# Altium PCB ledcube_v2.PcbDoc (part 18 of 18)
Units mil, origin at the board's own origin, x right, y up, seen from the top; angles counter-clockwise.
Board outline 3130 x 3300 mil, 2 copper layers (Top Layer, Bottom Layer); 188 components, 216 nets, 29515 pads, 250 vias.
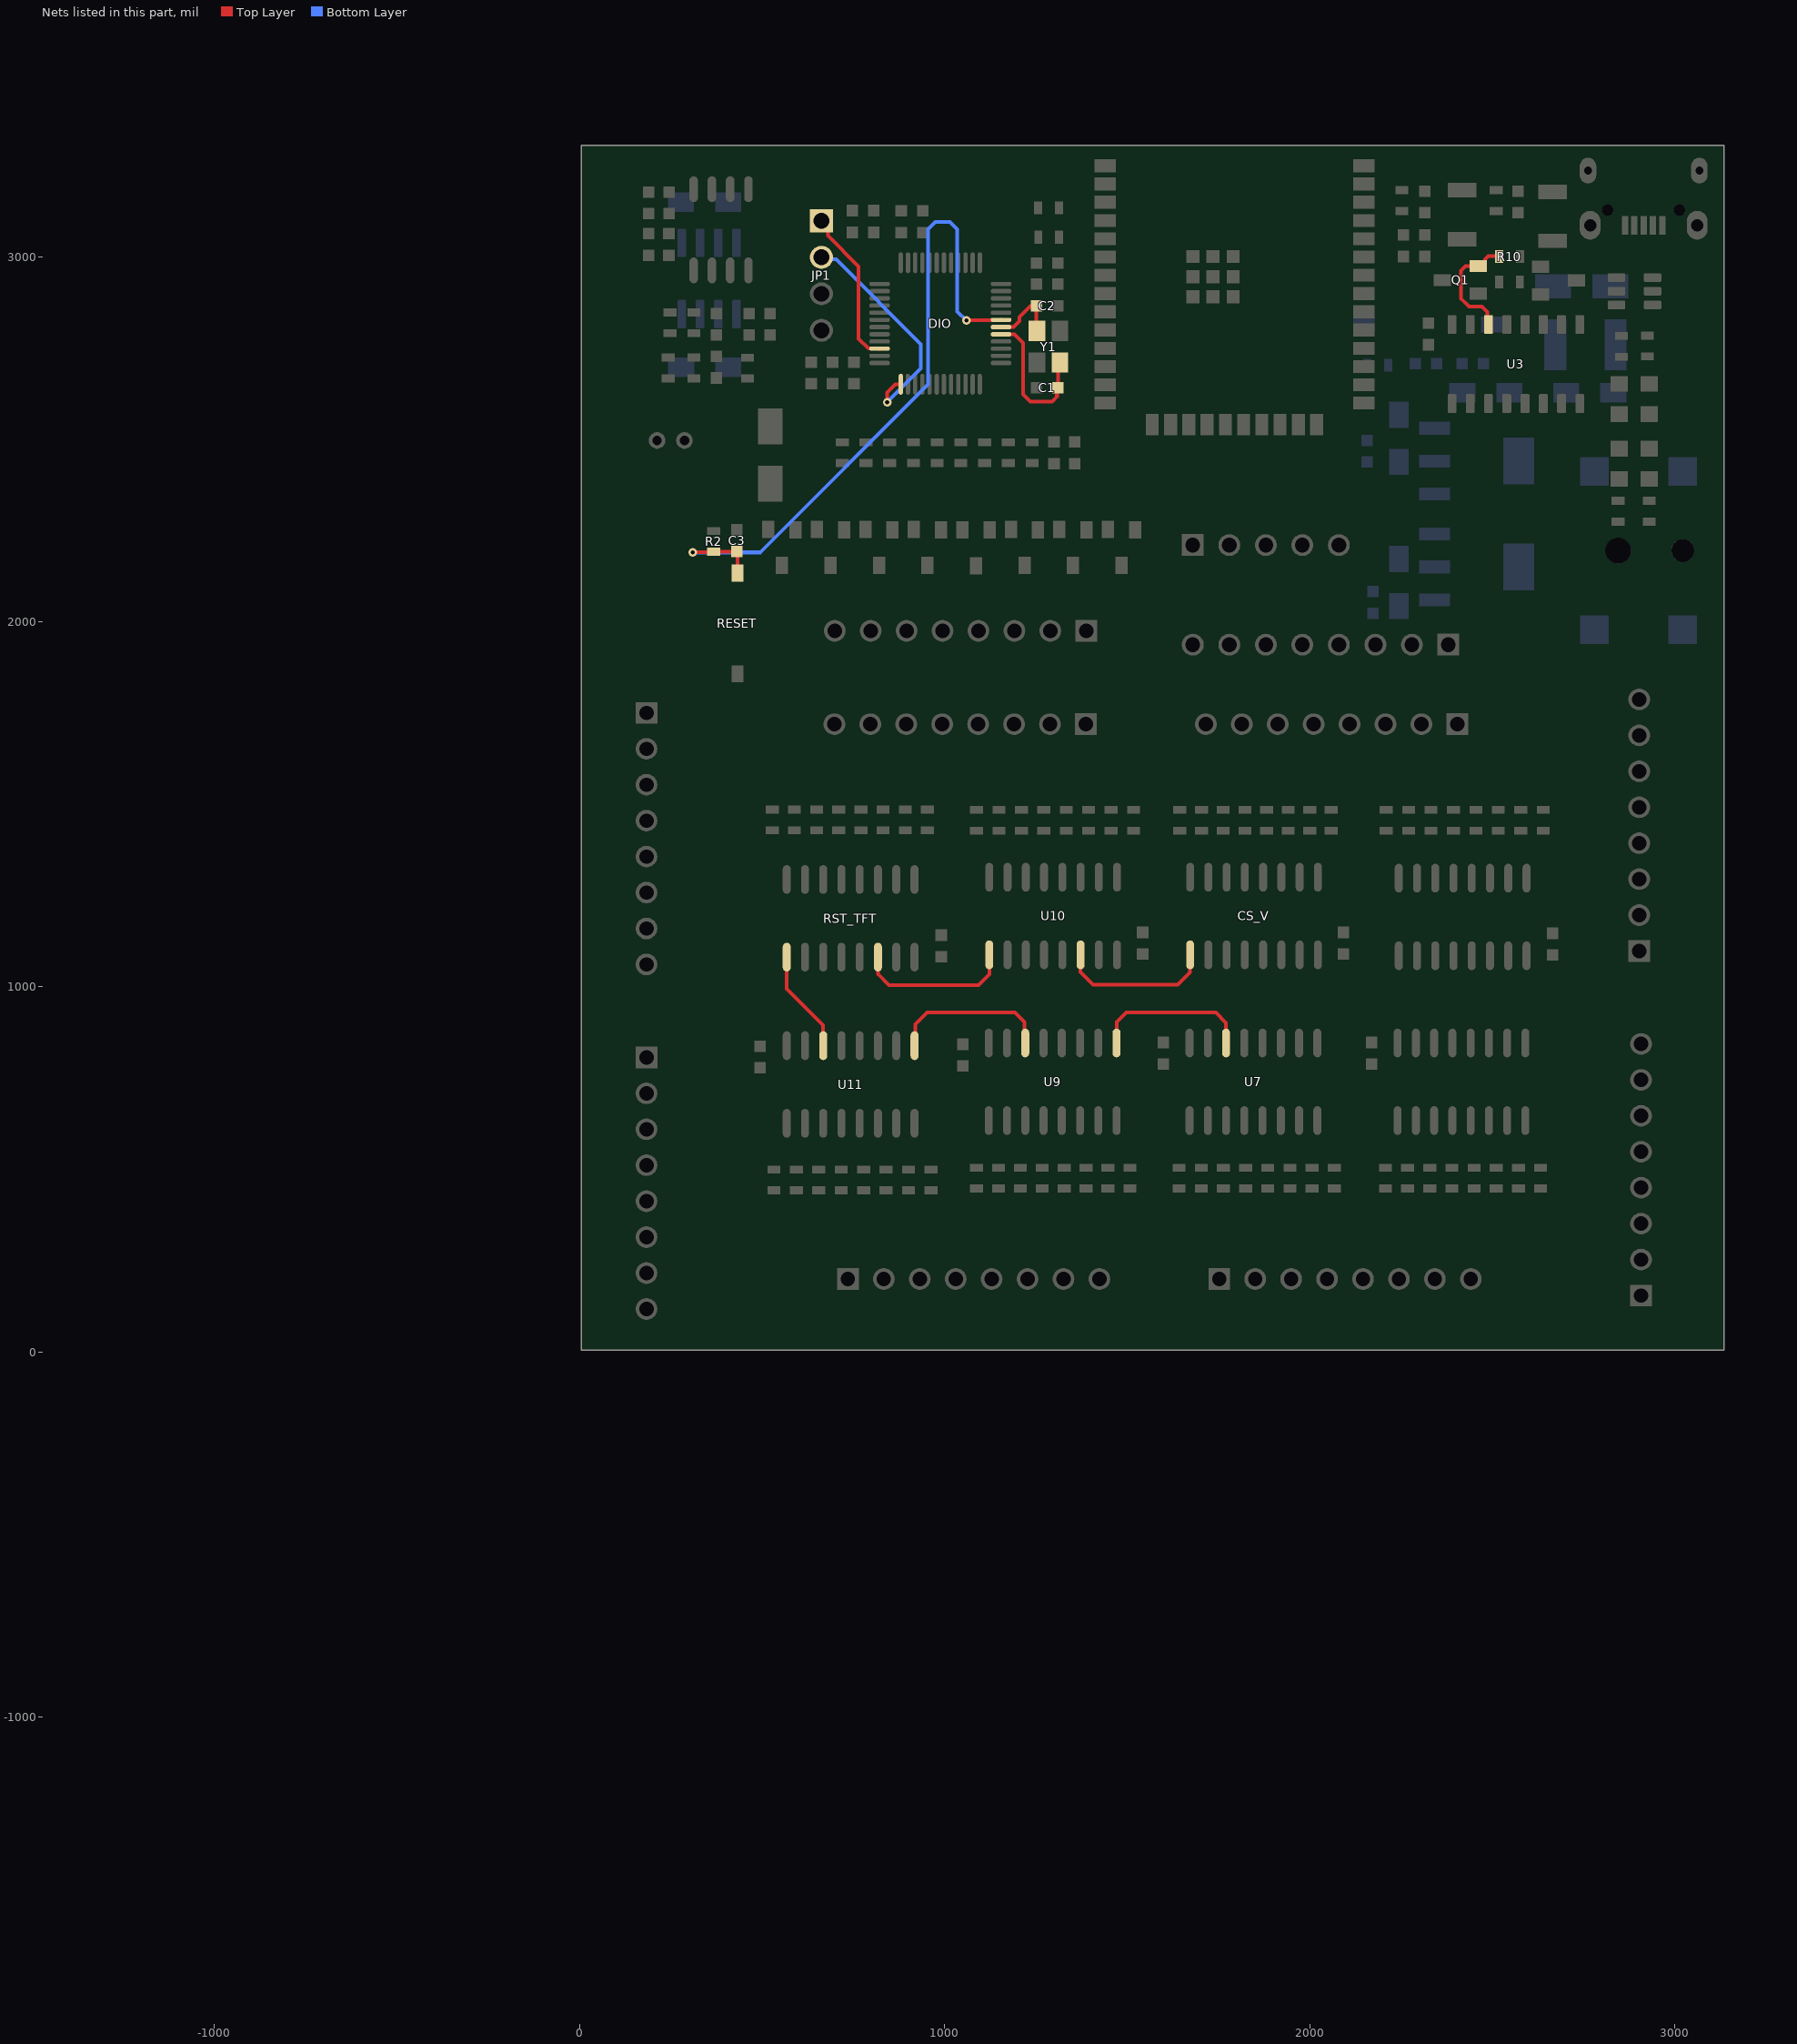
[diagram p17: the nets of this part, all layers, seen from the top]

## Via types
v1: diameter 23.62, hole 11.81, Top Layer to Bottom Layer, tented both sides, 128 vias
v2: diameter 23.62, hole 11.81, Top Layer to Bottom Layer, 122 vias

## Nets (pads, with @x,y where several pads share a name; then routed paths per layer and width w, separated by ;. In a path a pad name is that pad's centre, name@x,y a point inside that pad or via, vN(x,y) a via of type N, cw(c..) or ccw(c..) an arc to the next point about the centre after c; other vN are vias at no path point) (continued)
NetU7_14: U7.14 U9.9 | length 434.8
  Top Layer w10: U9.9@1471.06,846.61 1471.06,903.58 1497.48,930 1742.95,930 1771.06,901.88 U7.14@1771.06,846.61
NetU8_9: CS_V.9 U10.14 | length 424.1
  Top Layer w10: U10.14@1372.56,1087.91 1372.56,1040.39 1407.4,1005.55 1638.03,1005.55 1672.56,1040.07 CS_V.9@1672.56,1087.91
NetU9_14: U9.14 U11.9 | length 440.9
  Top Layer w10: U11.9@917.56,839.21 919.66,841.31 919.66,897.18 952.72,930.23 1192.72,930.23 1218.83,904.11 1218.83,848.84 U9.14@1221.06,846.61
NetU10_9: RST_TFT.14 U10.9 | length 428.9
  Top Layer w10: RST_TFT.14@817.56,1081.61 817.56,1035.39 847.72,1005.23 1092.72,1005.23 1122.56,1035.07 U10.9@1122.56,1087.91
NetU11_14: RST_TFT.9 U11.14 | length 283.8
  Top Layer w10: RST_TFT.9@567.56,1081.61 567.56,995.39 667.56,895.39 U11.14@667.56,839.21
OSC_IN: C1.2 DIO.5 Y1.1 | length 414
  Top Layer w10: DIO.5@1154.66,2787.34 1155.01,2786.99 1190.96,2786.99 1214.72,2763.23 1214.72,2623.23 1234.74,2603.2 1294.74,2603.2 1307.85,2616.31 1307.85,2638.57 C1.2@1310.48,2641.2 1310.48,2704.14 Y1.1@1316.24,2709.9
OSC_OUT: C2.2 DIO.6 Y1.3 | length 197.1
  Top Layer w10: DIO.6@1154.66,2807.02 1188.56,2807.02 1204.74,2823.2 1204.74,2834.74 1234.7,2864.7 1251,2864.7 C2.2@1251.5,2865.2 1251.5,2798.25 Y1.3@1253.25,2796.51
RESET: C3.2 DIO.7 R2.1 RESET.2 | length 1895.2
  Top Layer w10: v1(310,2190) 310.84,2190.84 366.87,2190.84 R2.1@367.72,2191.69 429.7,2191.69 C3.2@430.72,2192.7 432.72,2190.7 RESET.2@432.72,2133.03 ; v1(1060,2825) 1061.36,2826.36 1154.32,2826.36 DIO.7@1154.66,2826.71
  Bottom Layer w10: v1(310,2190) 495,2190 955,2650 955,3075 975,3095 1015,3095 1035,3075 1035,2850 v1(1060,2825)
RTS: Q1.2 R10.1 U3.14 | length 324.2
  Top Layer w10: U3.14@2490,2814.21 2486.68,2817.53 2486.68,2848.32 2471.94,2863.06 2436.94,2863.06 2415,2885 2415,2961.74 2427.29,2974.03 2468.82,2974.03 2480.55,2985.76 2480.55,2992.65 2489.16,3001.26 2517.91,3001.26 R10.1@2519.17,3000
SWCLK: DIO.37 JP1.2 | length 641.5
  Top Layer w10: v1(842.72,2601.11) 842.72,2627.72 865.01,2650.01 879.54,2650.01 DIO.37@880.06,2650.53
  Bottom Layer w10: JP1.2@662.68,2998.2 668.5,2992.38 702.62,2992.38 935,2760 935,2693.39 v1(842.72,2601.11)
SWDIO: DIO.34 JP1.1 | length 433.8
  Top Layer w10: JP1.1@662.68,3098.2 680.38,3080.5 680.38,3057.57 764.74,2973.2 764.74,2775.26 791.69,2748.31 821.64,2748.31 DIO.34@821.99,2747.97
pads on no net: DIO.1 DIO.3 DIO.4 DIO.11 DIO.16 DIO.18 DIO.19 DIO.20 DIO.21 DIO.22 DIO.25 DIO.26 DIO.27 DIO.28 DIO.29 DIO.30 DIO.31 DIO.32 DIO.33 GND.4@1439.84,3098.82 GND.5@1439.84,3048.82 GND.6@1439.84,2998.82 GND.7@1439.84,2948.82 GND.8@1439.84,2898.82 GND.17 GND.18 GND.19 GND.20 GND.21 GND.22 GND.23 GND.26 GND.31 GND.32 GND.33 GND.36 GND.39 IC1.5 IC1.6 IC1.7 J13.MH1 J13.MH2 MISO_H.4 MISO_H.MH1 MISO_H.MH2 U3.7 U3.8 U3.9 U3.10 U3.11 U3.12 U3.15 U5.9 U13.1 U13.7
copper on no net:
  other v2: 1707.56,2889.76 1762.68,2889.76 1680,2917.32 1735.12,2917.32 1790.24,2917.32 1707.56,2944.88 1762.68,2944.88 1680,2972.44 1735.12,2972.44 1790.24,2972.44 1707.56,3000 1762.68,3000

## Polygon pours and split planes (outlines as drawn)
GND on Bottom Layer "GND_L02_P001" (solid, remove dead copper, pour order 1): 0,3310 3140,3310 3140,0 0,0
GND on Top Layer "GND_L01_P000" (solid, remove dead copper, pour order 0): 0,3310 3140,3310 3140,0 0,0

## Keep-outs
Keep-Out Layer:
  the board outline again, w10

## Other copper
Top Layer:
  drawing of 1649 lines, arcs and shapes, not listed
Bottom Layer:
  region net 5V: 195,3025.71 195,3205 255,3265 490,3265 510,3245 510,3095 500,3085 420,3085 400,3065 400,2945 495,2850 495,2590 225,2320 225,2130 575,1780 1460,1780 1460,1800 1445,1815 605,1815 265,2155 265,2310 525,2570 525,2875 445,2955 445,3005 470,3030 490,3030 530,3070 530,3260 505,3285 235,3285 170,3220 170,3035 147,3012
  pour cut-out: 545,3293.44 545,2466.56 125,2466.56 125,3293.44
  pour cut-out: 1210,2895 1360,2895 1360,2605 1210,2605
  pour cut-out: 1190,2615 1190,3015 785,3015 785,2615
  region net 5V: 1435,1780 1440,1775 1440,1440 1530,1350 1530,1060 1520,1050 1520,1025 1530,1015 1555,1015 1565,1025 1565,1050 1555,1060 1555,1355 1465,1445 1465,1780
  region net 5V: 135,3025 175,3025 185,3035 200,3035 200,2955 180,2955 180,2975 170,2985 135,2985 125,2995 125,3015 125,3000 125,3015
  region net 5V: 180,2655 200,2655 210,2665 210,2690 200,2700 200,2955 180,2955 180,2700 170,2690 170,2665
  region net NetC37_2: 360,2875 370,2885 395,2885 405,2875 405,2765 420,2750 450,2720 450,2675 440,2665 375,2665 360,2680
  region net NetC37_1: 265,2855 265,2880 275,2890 290,2890 300,2880 300,2745 320,2725 320,2675 310,2665 245,2665 240,2670 240,2720 265,2745
  region net -5V: 240,3175 310,3245 470,3245 475,3240 475,3230 470,3225 320,3225 300,3205 300,3190 315,3175 315,3120 295,3100 295,3000 285,2990 270,2990 260,3000 260,3100 240,3120
  region net NetC43_2: 2105,2825 2125,2845 2170,2845 2225,2790 2225,2735 2235,2725 2305,2725 2315,2715 2315,2695 2310,2690 2230,2690 2220,2680 2195,2680 2185,2690 2185,2715 2195,2725 2195,2775 2180,2790 2120,2790 2105,2805
  region net 5V_USB: 2985,2915 2995,2905 3015,2905 3025,2915 3025,2940 3015,2950 3000,2950 2955,2995 2590,2995 2485,2890 2485,2855 2460,2830 2405,2830 2325,2750 2325,2695 2335,2685 2365,2685 2380,2700 2380,2755 2430,2805 2455,2805 2470,2790 2525,2790 2535,2800 2535,2830 2520,2845 2520,2890 2600,2970 2960,2970 2985,2945 2985,2935
  region net 3V3: 2522.5,2230 2605,2230 2645,2190 2645,2120 2610,2085 2610,2020 2485,1895 2390,1895 2355,1895 2335,1915 2335,1960 2350,1975 2480,1975 2525,2020 2525,2080 2475,2130 2240,2130 2205,2095 2205,2070 2195,2060 2155,2060 2145,2070 2145,2145 2210,2210 2492.5,2210
  region net 5V: 2505,2485 2540,2520 2610,2520 2640,2490 2640,2390 2605,2355 2545,2355 2515,2385 2485,2415 2295,2415 2275,2395 2210,2395 2195,2395 2175,2380 2175,2360 2270,2265 2455,2265 2465,2255 2465,2235 2455,2225 2245,2225 2120,2350 2120,2429.94 2120,2440 2145,2465 2200,2465 2220,2485 2275,2485 2295,2465 2490,2465
  region net 9V: 2600,2935 2625,2960 2710,2960 2735,2935 2735,2715 2700,2680 2640,2680 2625,2695 2625,2715 2595,2745 2465,2745 2440,2720 2440,2675 2460,2655 2460,2600 2450,2590 2390,2590 2370,2570 2370,2565 2390,2545 2390,2515 2375,2500 2305,2500 2290,2515 2290,2550 2320,2580 2320,2605 2360,2645 2365,2650 2370,2655 2390,2675 2390,2740 2425,2775 2580,2775 2600,2795
  region net NetC36_2: 2780,2815 2810,2845 2860,2845 2890,2815 2890,2605 2865,2580 2865,2540 2865,2510 2900,2475 3075,2475 3100,2450 3100,2380 3075,2355 2740,2355 2710,2385 2710,2455 2765,2510 2765,2800

## Silkscreen, mask and mechanical layers (free items; w line width, h text height)
Top Overlay:
  drawing of 31 lines, arcs and shapes, not listed
Bottom Overlay:
  drawing of 58 lines, arcs and shapes, not listed
  text "LEDCUBE 8x8x8 - ver 1" at 1325,1160.62 h59.06
Mechanical 2:
  drawing of 11198 lines, arcs and shapes, not listed
Top Tenting:
  drawing of 33371 lines, arcs and shapes, not listed
Top 3D Body:
  lines w0: -1372.3,-1735.55 ccw(c-1372.3,-1735.55) -1372.3,-1735.55 ; -1372.3,-1735.55 ccw(c-1372.3,-1735.55) -1372.3,-1735.55 ; -1372.29,-1735.57 -1372.39,-1735.57 -1372.39,-1735.44 -1372.29,-1735.44 -1372.29,-1735.57
  text "Y1" at -1372.32,-1735.55 h0.04 r90
Bottom 3D Body:
  drawing of 1630 lines, arcs and shapes, not listed
Bottom Tenting:
  drawing of 869 lines, arcs and shapes, not listed
Top Component Outline:
  lines w0: -1370.86,-1734.95 -1370.56,-1734.95
  text "PCB Edge" at -1370.66,-1734.93 h0.02 r180
Top Courtyard:
  lines w0: -1370.87,-1736.24 -1370.87,-1736.31 -1370.82,-1736.31 -1370.82,-1736.24 ; -1370.87,-1735.89 -1370.87,-1735.82 -1370.82,-1735.82 -1370.82,-1735.89 ; -1370.57,-1736.24 -1370.57,-1736.31 -1370.63,-1736.31 ; -1370.57,-1735.89 -1370.57,-1735.82 -1370.63,-1735.82 ; -1370.63,-1736.31 ccw(c-1370.63,-1736.31) -1370.63,-1736.31 ; -1370.63,-1736.31 ccw(c-1370.63,-1736.31) -1370.63,-1736.31 ; -1370.63,-1736.31 ccw(c-1370.63,-1736.31) -1370.63,-1736.31 ; -1370.63,-1736.31 ccw(c-1370.63,-1736.31) -1370.63,-1736.31 ; -1370.63,-1736.31 -1370.63,-1736.24 ; -1370.63,-1736.24 ccw(c-1370.63,-1736.24) -1370.63,-1736.24 ; -1370.63,-1736.24 ccw(c-1370.63,-1736.24) -1370.63,-1736.24 ; -1370.63,-1735.89 ccw(c-1370.63,-1735.89) -1370.63,-1735.89 ; -1370.63,-1735.89 ccw(c-1370.63,-1735.89) -1370.63,-1735.89 ; -1370.63,-1735.89 -1370.63,-1735.82 ; -1370.63,-1735.82 ccw(c-1370.63,-1735.82) -1370.63,-1735.82 ; -1370.63,-1735.82 ccw(c-1370.63,-1735.82) -1370.63,-1735.82 ; -1370.63,-1735.82 ccw(c-1370.63,-1735.82) -1370.63,-1735.82 ; -1370.63,-1735.82 ccw(c-1370.63,-1735.82) -1370.63,-1735.82 ; -1370.98,-1736.24 -1370.98,-1736.13 -1370.95,-1736.13 -1370.95,-1735.89 -1370.41,-1735.89 -1370.41,-1736.24 -1370.98,-1736.24
Top Designator:
  lines w0: -1370.68,-1736.08 -1370.68,-1736.05 ; -1370.66,-1736.07 -1370.7,-1736.07 ; -1370.69,-1736.07 ccw(c-1370.7,-1736.07) -1370.7,-1736.07 ; -1370.7,-1736.07 ccw(c-1370.7,-1736.07) -1370.69,-1736.07 ; -1370.99,-1736.33 -1370.4,-1736.33 -1370.4,-1735.8 -1370.99,-1735.8 -1370.99,-1736.33
Bottom Designator:
  lines w0: -1370.87,-1736.24 -1370.87,-1736.31 -1370.82,-1736.31 -1370.82,-1736.24 ; -1370.87,-1735.89 -1370.87,-1735.82 -1370.82,-1735.82 -1370.82,-1735.89 ; -1370.57,-1736.24 -1370.57,-1736.31 -1370.63,-1736.31 ; -1370.57,-1735.89 -1370.57,-1735.82 -1370.63,-1735.82 ; -1370.63,-1736.31 ccw(c-1370.63,-1736.31) -1370.63,-1736.31 ; -1370.63,-1736.31 ccw(c-1370.63,-1736.31) -1370.63,-1736.31 ; -1370.63,-1736.31 ccw(c-1370.63,-1736.31) -1370.63,-1736.31 ; -1370.63,-1736.31 ccw(c-1370.63,-1736.31) -1370.63,-1736.31 ; -1370.63,-1736.31 -1370.63,-1736.24 ; -1370.63,-1736.24 ccw(c-1370.63,-1736.24) -1370.63,-1736.24 ; -1370.63,-1736.24 ccw(c-1370.63,-1736.24) -1370.63,-1736.24 ; -1370.63,-1735.89 ccw(c-1370.63,-1735.89) -1370.63,-1735.89 ; -1370.63,-1735.89 ccw(c-1370.63,-1735.89) -1370.63,-1735.89 ; -1370.63,-1735.89 -1370.63,-1735.82 ; -1370.63,-1735.82 ccw(c-1370.63,-1735.82) -1370.63,-1735.82 ; -1370.63,-1735.82 ccw(c-1370.63,-1735.82) -1370.63,-1735.82 ; -1370.63,-1735.82 ccw(c-1370.63,-1735.82) -1370.63,-1735.82 ; -1370.63,-1735.82 ccw(c-1370.63,-1735.82) -1370.63,-1735.82 ; -1370.98,-1736.24 -1370.41,-1736.24 -1370.41,-1735.89 -1370.95,-1735.89 -1370.95,-1736.13 -1370.98,-1736.13 -1370.98,-1736.24
Mechanical 11:
  text "J13" at -1370.65,-1735.99 h0.06 r90
Mechanical 13:
  lines w0.01: -1373.62,-1738.26 -1370.49,-1738.26 -1370.49,-1734.95 -1373.62,-1734.95 -1373.62,-1738.26
  lines w0.5: -1371.23,-1735.13 ccw(c-1371.23,-1735.12) -1371.23,-1735.1 ccw(c-1371.23,-1735.12) -1371.23,-1735.13 ; -1371.19,-1735.19 ccw(c-1371.19,-1735.17) -1371.19,-1735.16 ccw(c-1371.19,-1735.17) -1371.19,-1735.19 ; -1370.98,-1735.14 ccw(c-1370.98,-1735.12) -1370.98,-1735.11 ccw(c-1370.98,-1735.12) -1370.98,-1735.14 ; -1370.94,-1735.19 ccw(c-1370.94,-1735.18) -1370.94,-1735.16 ccw(c-1370.94,-1735.18) -1370.94,-1735.19
Mechanical 14:
  drawing of 1176 lines, arcs and shapes, not listed
Mechanical 15:
  drawing of 990 lines, arcs and shapes, not listed
  text "C34" at -1373.5,-1735.05 h0.04
  text "C35" at -1373.5,-1735.31 h0.04
  text "C28" at -1373.42,-1735.31 h0.04
  text "C29" at -1373.42,-1735.05 h0.04
  text "R83" at -1373.41,-1735.38 h0.04
  text "R84" at -1373.35,-1735.38 h0.04
  text "C30" at -1373.28,-1735.38 h0.04
  text "IC1" at -1373.26,-1735.03 h0.04
  text "C33" at -1373.21,-1735.38 h0.04
  text "C32" at -1373.14,-1735.38 h0.04
  text "3V3" at -1373.08,-1735.31 h0.04 r90
  text "CLK" at -1373.08,-1735.14 h0.04 r90
  text "DIO" at -1373.08,-1735.05 h0.04 r90
  text "GND" at -1373.08,-1735.24 h0.04 r90
  text "JP1" at -1372.98,-1735.18 h0.04
  text "C14" at -1372.88,-1735.1 h0.04
  text "C13" at -1372.88,-1735.25 h0.04
  text "C5" at -1372.8,-1735.1 h0.04
  text "C4" at -1372.8,-1735.25 h0.04
  text "C6" at -1372.28,-1735.29 h0.04
  text "C7" at -1372.28,-1735.35 h0.04
  text "C2" at -1372.28,-1735.41 h0.04
  text "R5" at -1372.28,-1735.14 h0.04
  text "R6" at -1372.28,-1735.22 h0.04
  text "C18" at -1371.42,-1735.32 h0.04
  text "R7" at -1371.39,-1735.04 h0.04
  text "C17" at -1371.35,-1735.32 h0.04
  text "C15" at -1371.34,-1735.04 h0.04
  text "Q1" at -1371.27,-1735.39 h0.04 r90
  text "EN" at -1371.23,-1735.04 h0.04
  text "EN" at -1371.23,-1735.04 h0.04
  text "R8" at -1371.14,-1735.04 h0.04
  text "R10" at -1371.11,-1735.22 h0.04
  text "R9" at -1371.1,-1735.39 h0.04
  text "C16" at -1371.08,-1735.04 h0.04
  text "BOOT" at -1371.01,-1735.05 h0.04
  text "BOOT" at -1371.01,-1735.05 h0.04
  text "Q2" at -1370.88,-1735.35 h0.04 r270
  text "KHANH" at -1373.58,-1736.21 h0.08
  text "LINH" at -1373.46,-1736.27 h0.08
  text "R85" at -1373.42,-1735.65 h0.04
  text "R87" at -1373.34,-1735.65 h0.04
  text "R2" at -1373.28,-1735.98 h0.04
  text "C31" at -1373.27,-1735.65 h0.04
  text "C3" at -1373.22,-1735.98 h0.04
  text "R86" at -1373.19,-1735.65 h0.04
  text "RESET" at -1373.08,-1736.33 h0.04 r90
  text "C10" at -1373.03,-1735.67 h0.04
  text "D3" at -1373.02,-1735.74 h0.04
  text "C12" at -1372.96,-1735.67 h0.04
  text "C11" at -1372.89,-1735.67 h0.04
  text "R11" at -1372.89,-1735.92 h0.04 r90
  text "R28" at -1372.83,-1735.92 h0.04 r90
  text "R31" at -1372.76,-1735.91 h0.04 r90
  text "R46" at -1372.7,-1735.91 h0.04 r90
  text "R51" at -1372.63,-1735.91 h0.04 r90
  text "R64" at -1372.57,-1735.91 h0.04 r90
  text "R1" at -1372.5,-1735.91 h0.04 r90
  text "R71" at -1372.43,-1735.92 h0.04 r90
  text "R82" at -1372.37,-1735.92 h0.04 r90
  text "C9" at -1372.31,-1735.92 h0.04 r90
  text "C1" at -1372.28,-1735.63 h0.04
  text "Y1" at -1372.28,-1735.57 h0.04
  text "C8" at -1372.26,-1735.92 h0.04 r90
  text "3V3" at -1372.08,-1736.24 h0.04
  text "T_IRQ" at -1372.08,-1735.95 h0.04
  text "GND" at -1372,-1736.24 h0.04
  text "MISO_H" at -1371.94,-1735.95 h0.04
  text "CS_V" at -1371.9,-1736.23 h0.04
  text "RST_TFT" at -1371.78,-1736.23 h0.04
  text "MOSI_H" at -1371.77,-1735.95 h0.04
  text "CS_H" at -1371.61,-1735.95 h0.04
  text "DC_TFT" at -1371.59,-1736.23 h0.04
  text "CLK_H" at -1371.49,-1735.95 h0.04
  text "MOSI_V" at -1371.43,-1736.23 h0.04
  text "C19" at -1371.33,-1735.5 h0.04 r90
  text "CLK_V" at -1371.27,-1736.23 h0.04
  text "3V3" at -1371.13,-1736.24 h0.04
  text "5V" at -1370.82,-1735.85 h0.04 r90
  text "5V" at -1370.82,-1735.85 h0.04 r90
  text "STM32" at -1370.82,-1735.71 h0.04 r90
  text "STM32" at -1370.82,-1735.71 h0.04 r90
  text "R90" at -1370.82,-1735.99 h0.04 r90
  text "R3" at -1370.81,-1735.53 h0.04 r90
  text "R4" at -1370.64,-1735.53 h0.04 r90
  text "R88" at -1370.63,-1735.99 h0.04 r90
  text "3V3" at -1370.62,-1735.86 h0.04 r90
  text "ESP32" at -1370.62,-1735.71 h0.04 r90
  text "3V3" at -1370.62,-1735.86 h0.04 r90
  text "ESP32" at -1370.62,-1735.71 h0.04 r90
  text "R81" at -1373.09,-1736.74 h0.04 r90
  text "R79" at -1373.02,-1736.75 h0.04 r90
  text "R77" at -1372.96,-1736.74 h0.04 r90
  text "R75" at -1372.9,-1736.75 h0.04 r90
  text "R73" at -1372.84,-1736.74 h0.04 r90
  text "R70" at -1372.78,-1736.74 h0.04 r90
  text "R68" at -1372.72,-1736.75 h0.04 r90
  text "R66" at -1372.66,-1736.74 h0.04 r90
  text "C23" at -1372.62,-1737.08 h0.04 r90
  text "R63" at -1372.53,-1736.74 h0.04 r90
  text "R61" at -1372.46,-1736.74 h0.04 r90
  text "R59" at -1372.4,-1736.75 h0.04 r90
  text "R57" at -1372.34,-1736.74 h0.04 r90
  text "U10" at -1372.33,-1737.09 h0.04
  text "R55" at -1372.28,-1736.75 h0.04 r90
  text "R53" at -1372.22,-1736.74 h0.04 r90
  text "R50" at -1372.16,-1736.74 h0.04 r90
  text "R48" at -1372.09,-1736.75 h0.04 r90
  text "C22" at -1372.07,-1737.08 h0.04 r90
  text "R45" at -1371.97,-1736.75 h0.04 r90
  text "R43" at -1371.91,-1736.75 h0.04 r90
  text "R41" at -1371.85,-1736.75 h0.04 r90
  text "R39" at -1371.79,-1736.75 h0.04 r90
  text "R37" at -1371.73,-1736.74 h0.04 r90
  text "R35" at -1371.67,-1736.75 h0.04 r90
  text "R33" at -1371.61,-1736.74 h0.04 r90
  text "R30" at -1371.55,-1736.74 h0.04 r90
  text "C21" at -1371.52,-1737.07 h0.04 r90
  text "R27" at -1371.4,-1736.75 h0.04 r90
  text "R25" at -1371.34,-1736.75 h0.04 r90
  text "R23" at -1371.28,-1736.74 h0.04 r90
  text "R21" at -1371.22,-1736.74 h0.04 r90
  text "R19" at -1371.16,-1736.75 h0.04 r90
  text "R17" at -1371.1,-1736.74 h0.04 r90
  text "R15" at -1371.03,-1736.75 h0.04 r90
  text "R13" at -1370.97,-1736.74 h0.04 r90
  text "C20" at -1370.95,-1737.08 h0.04 r90
  text "C27" at -1373.12,-1737.58 h0.04 r90
  text "R65" at -1373.08,-1737.91 h0.04 r90
  text "R67" at -1373.02,-1737.9 h0.04 r90
  text "R69" at -1372.96,-1737.91 h0.04 r90
  text "U11" at -1372.96,-1737.52 h0.04
  text "R72" at -1372.9,-1737.9 h0.04 r90
  text "R74" at -1372.84,-1737.9 h0.04 r90
  text "R76" at -1372.77,-1737.9 h0.04 r90
  text "R78" at -1372.71,-1737.91 h0.04 r90
  text "R80" at -1372.65,-1737.9 h0.04 r90
  text "C26" at -1372.56,-1737.58 h0.04 r90
  text "R47" at -1372.53,-1737.91 h0.04 r90
  text "R49" at -1372.47,-1737.91 h0.04 r90
  text "R52" at -1372.41,-1737.9 h0.04 r90
  text "U9" at -1372.41,-1737.54 h0.04
  text "R54" at -1372.35,-1737.9 h0.04 r90
  text "R56" at -1372.29,-1737.91 h0.04 r90
  text "R58" at -1372.23,-1737.91 h0.04 r90
  text "R60" at -1372.17,-1737.9 h0.04 r90
  text "R62" at -1372.11,-1737.9 h0.04 r90
  text "C24" at -1372.01,-1737.58 h0.04 r90
  text "R29" at -1371.97,-1737.9 h0.04 r90
  text "R32" at -1371.91,-1737.9 h0.04 r90
  text "R34" at -1371.85,-1737.9 h0.04 r90
  text "U7" at -1371.85,-1737.52 h0.04
  text "R36" at -1371.79,-1737.9 h0.04 r90
  text "R38" at -1371.73,-1737.9 h0.04 r90
  text "R40" at -1371.67,-1737.9 h0.04 r90
  text "R42" at -1371.61,-1737.9 h0.04 r90
  text "R44" at -1371.55,-1737.9 h0.04 r90
  text "C25" at -1371.44,-1737.58 h0.04 r90
  text "R12" at -1371.4,-1737.9 h0.04 r90
  text "R14" at -1371.34,-1737.9 h0.04 r90
  text "R16" at -1371.28,-1737.9 h0.04 r90
  text "U5" at -1371.27,-1737.55 h0.04
  text "R18" at -1371.22,-1737.91 h0.04 r90
  text "R20" at -1371.16,-1737.9 h0.04 r90
  text "R22" at -1371.1,-1737.9 h0.04 r90
  text "R24" at -1371.04,-1737.9 h0.04 r90
  text "R26" at -1370.98,-1737.9 h0.04 r90
Bottom Courtyard:
  drawing of 12723 lines, arcs and shapes, not listed
  text "C38" at -1373.17,-1735.05 h0.04
  text "U13" at -1373.16,-1735.4 h0.04 r270
  text "S2" at -1371.11,-1735.4 h0.04
  text "D4" at -1370.76,-1735.26 h0.04
  text "C37" at -1373.17,-1735.65 h0.04
  text "C42" at -1371.53,-1735.82 h0.04 r270
  text "C45" at -1371.51,-1736.24 h0.04 r270
  text "C40" at -1371.48,-1735.71 h0.04 r270
  text "R89" at -1371.47,-1735.51 h0.04
  text "C44" at -1371.46,-1736.14 h0.04 r270
  text "C43" at -1371.27,-1735.62 h0.04
  text "J13" at -1371.17,-1736.18 h0.04 r180
  text "C41" at -1371.09,-1735.51 h0.04
  text "U14" at -1371.08,-1735.95 h0.04 r270
  text "U15" at -1371.08,-1736.24 h0.04 r270
  text "C39" at -1371.01,-1735.71 h0.04
  text "C36" at -1370.75,-1735.71 h0.04
  text "F1" at -1370.73,-1735.57 h0.04 r270
Mechanical 17:
  drawing of 97 lines, arcs and shapes, not listed
Mechanical 18:
  drawing of 96 lines, arcs and shapes, not listed
Mechanical 19:
  drawing of 1239 lines, arcs and shapes, not listed
Mechanical 20:
  drawing of 223 lines, arcs and shapes, not listed
Mechanical 21:
  drawing of 103 lines, arcs and shapes, not listed
Mechanical 22:
  circle w0.5: c-1371.92,-1735.26 r0.01
  circle w0.5: c-1371.86,-1735.26 r0.01
  circle w0.5: c-1371.86,-1735.32 r0.01
  circle w0.5: c-1371.92,-1735.32 r0.01
  circle w0.5: c-1371.94,-1735.29 r0.01
  circle w0.5: c-1371.89,-1735.29 r0.01
  circle w0.5: c-1371.83,-1735.29 r0.01
  circle w0.5: c-1371.86,-1735.37 r0.01
  circle w0.5: c-1371.94,-1735.34 r0.01
  circle w0.5: c-1371.89,-1735.34 r0.01
  circle w0.5: c-1371.83,-1735.34 r0.01
  circle w0.5: c-1371.92,-1735.37 r0.01
  circle w0.5: c-1371.14,-1737.32 r0.01
  circle w0.5: c-1371.13,-1737.11 r0.01
  circle w0.5: c-1371.23,-1737.08 r0.01
  circle w0.5: c-1373.01,-1737.27 r0.01
  circle w0.5: c-1372.96,-1737.27 r0.01
  circle w0.5: c-1372.58,-1737.36 r0.01
  circle w0.5: c-1371.46,-1737.36 r0.01
  circle w0.5: c-1372.03,-1737.36 r0.01
  circle w0.5: c-1372.26,-1737.32 r0.01
  circle w0.5: c-1370.96,-1737.22 r0.01
  circle w0.5: c-1371.53,-1737.22 r0.01
  circle w0.5: c-1372.08,-1737.22 r0.01
  circle w0.5: c-1372.64,-1737.22 r0.01
  circle w0.5: c-1372.4,-1737.27 r0.01
  circle w0.5: c-1371.7,-1737.32 r0.01
  circle w0.5: c-1371.28,-1737.27 r0.01
  circle w0.5: c-1371.85,-1737.27 r0.01
  circle w0.5: c-1371.17,-1736.02 r0.01
  circle w0.5: c-1372.81,-1737.33 r0.01
  circle w0.5: c-1372.57,-1735.43 r0.01
  circle w0.5: c-1372.57,-1735.2 r0.01
  circle w0.5: c-1372.41,-1735.28 r0.01
  circle w0.5: c-1372.18,-1736.46 r0.01
  circle w0.5: c-1372.78,-1735.66 r0.01
  circle w0.5: c-1373.49,-1735.26 r0.01
  circle w0.5: c-1373.32,-1736.02 r0.01
  circle w0.5: c-1373.32,-1736.07 r0.01
  circle w0.5: c-1373.43,-1735.59 r0.01
  circle w0.5: c-1370.56,-1735.29 r0.01
  circle w0.5: c-1370.62,-1735.34 r0.01
  circle w0.5: c-1371.9,-1735.8 r0.01
  circle w0.5: c-1371.36,-1735.17 r0.01
  circle w0.5: c-1371.96,-1735.78 r0.01
  circle w0.5: c-1372.37,-1735.08 r0.01
  circle w0.5: c-1371.64,-1735.52 r0.01
  circle w0.5: c-1371.73,-1735.52 r0.01
  circle w0.5: c-1372.12,-1735.56 r0.01
  circle w0.5: c-1372.23,-1735.25 r0.01
  circle w0.5: c-1372.53,-1735.2 r0.01
  circle w0.5: c-1370.72,-1735.28 r0.01
  circle w0.5: c-1372.24,-1735.46 r0.01
  circle w0.5: c-1372.24,-1735.51 r0.01
  circle w0.5: c-1372.24,-1735.42 r0.01
  circle w0.5: c-1373.15,-1735.02 r0.01
  circle w0.5: c-1370.9,-1735.25 r0.01
  circle w0.5: c-1370.56,-1735.34 r0.01
  circle w0.5: c-1373.24,-1735.36 r0.01
  circle w0.5: c-1372.27,-1735.34 r0.01
  circle w0.5: c-1372.44,-1735.62 r0.01
  circle w0.5: c-1372.64,-1735.22 r0.01
  circle w0.5: c-1372.72,-1735.55 r0.01
  circle w0.5: c-1372.12,-1735.61 r0.01
  circle w0.5: c-1372.35,-1735.72 r0.01
  circle w0.5: c-1372.11,-1735.21 r0.01
  circle w0.5: c-1371.92,-1735.1 r0.01
  circle w0.5: c-1371.42,-1735.07 r0.01
  circle w0.5: c-1371.42,-1735.02 r0.01
  circle w0.5: c-1371.2,-1735.91 r0.01
  circle w0.5: c-1371.38,-1736.16 r0.01
  circle w0.5: c-1371.34,-1735.44 r0.01
  circle w0.5: c-1371.54,-1735.7 r0.01
  circle w0.5: c-1371.54,-1735.8 r0.01
  circle w0.5: c-1372.14,-1735.04 r0.01
  circle w0.5: c-1372.78,-1735.13 r0.01
  circle w0.5: c-1372.64,-1735.13 r0.01
  circle w0.5: c-1373.39,-1735.34 r0.01
  circle w0.5: c-1373.52,-1735.08 r0.01
  circle w0.5: c-1373.52,-1735.2 r0.01
  circle w0.5: c-1373.52,-1735.17 r0.01
  circle w0.5: c-1373.52,-1735.14 r0.01
  circle w0.5: c-1373.52,-1735.11 r0.01
  circle w0.5: c-1373.52,-1735.04 r0.01
  circle w0.5: c-1373.52,-1735.01 r0.01
  circle w0.5: c-1373.52,-1734.98 r0.01
  circle w0.5: c-1373.52,-1735.33 r0.01
  circle w0.5: c-1373.52,-1735.45 r0.01
  circle w0.5: c-1373.52,-1735.42 r0.01
  circle w0.5: c-1373.52,-1735.39 r0.01
  circle w0.5: c-1373.52,-1735.36 r0.01
  circle w0.5: c-1373.52,-1735.3 r0.01
  circle w0.5: c-1373.52,-1735.27 r0.01
  circle w0.5: c-1373.52,-1735.23 r0.01
  circle w0.5: c-1373.52,-1735.58 r0.01
  circle w0.5: c-1373.52,-1735.7 r0.01
  circle w0.5: c-1373.52,-1735.67 r0.01
  circle w0.5: c-1373.52,-1735.64 r0.01
  circle w0.5: c-1373.52,-1735.61 r0.01
  circle w0.5: c-1373.52,-1735.55 r0.01
  circle w0.5: c-1373.52,-1735.52 r0.01
  circle w0.5: c-1373.52,-1735.48 r0.01
  circle w0.5: c-1373.52,-1735.83 r0.01
  circle w0.5: c-1373.52,-1735.89 r0.01
  circle w0.5: c-1373.52,-1735.86 r0.01
  circle w0.5: c-1373.52,-1735.8 r0.01
  circle w0.5: c-1373.52,-1735.77 r0.01
  circle w0.5: c-1373.52,-1735.73 r0.01
  circle w0.5: c-1373.06,-1735.86 r0.01
  circle w0.5: c-1373.06,-1735.83 r0.01
  circle w0.5: c-1373.27,-1735.89 r0.01
  circle w0.5: c-1373.49,-1735.89 r0.01
  circle w0.5: c-1373.43,-1735.89 r0.01
  circle w0.5: c-1373.4,-1735.89 r0.01
  circle w0.5: c-1373.46,-1735.89 r0.01
  circle w0.5: c-1373.23,-1735.89 r0.01
  circle w0.5: c-1373.05,-1735.54 r0.01
  circle w0.5: c-1373.05,-1735.57 r0.01
  circle w0.5: c-1373.05,-1735.64 r0.01
  circle w0.5: c-1373.05,-1735.61 r0.01
  circle w0.5: c-1373.05,-1735.36 r0.01
  circle w0.5: c-1373.05,-1735.26 r0.01
  circle w0.5: c-1373.05,-1735.29 r0.01
  circle w0.5: c-1373.05,-1735.33 r0.01
  circle w0.5: c-1373.05,-1735.39 r0.01
  circle w0.5: c-1373.05,-1735.42 r0.01
  circle w0.5: c-1373.05,-1735.45 r0.01
  circle w0.5: c-1373.05,-1735.48 r0.01
  circle w0.5: c-1373.05,-1735.51 r0.01
  circle w0.5: c-1373.05,-1735.01 r0.01
  circle w0.5: c-1373.05,-1735.17 r0.01
  circle w0.5: c-1373.05,-1735.2 r0.01
  circle w0.5: c-1373.05,-1735.23 r0.01
  circle w0.5: c-1373.05,-1735.04 r0.01
  circle w0.5: c-1373.05,-1735.14 r0.01
  circle w0.5: c-1373.05,-1735.11 r0.01
  circle w0.5: c-1373.05,-1735.08 r0.01
  circle w0.5: c-1373.14,-1735.89 r0.01
  circle w0.5: c-1373.06,-1735.89 r0.01
  circle w0.5: c-1373.1,-1735.89 r0.01
  circle w0.5: c-1373.05,-1734.98 r0.01

## Text inside footprints (layer, text, board x,y; h text height)
MISO_H: Mechanical 2 "PCB Edge" at 2966.18,3329.92 h16 r180